# Altium PCB Audio-Switch-v2.0.PcbDoc (part 2 of 3)
Units mil, origin at the board's own origin, x right, y up, seen from the top; angles counter-clockwise.
Board outline 3937.01 x 3149.61 mil, 4 copper layers (Top Layer, Ground Layer, Power Layer, Bottom Layer), stack 60.4 mil thick; 165 components, 115 nets, 627 pads, 263 vias.
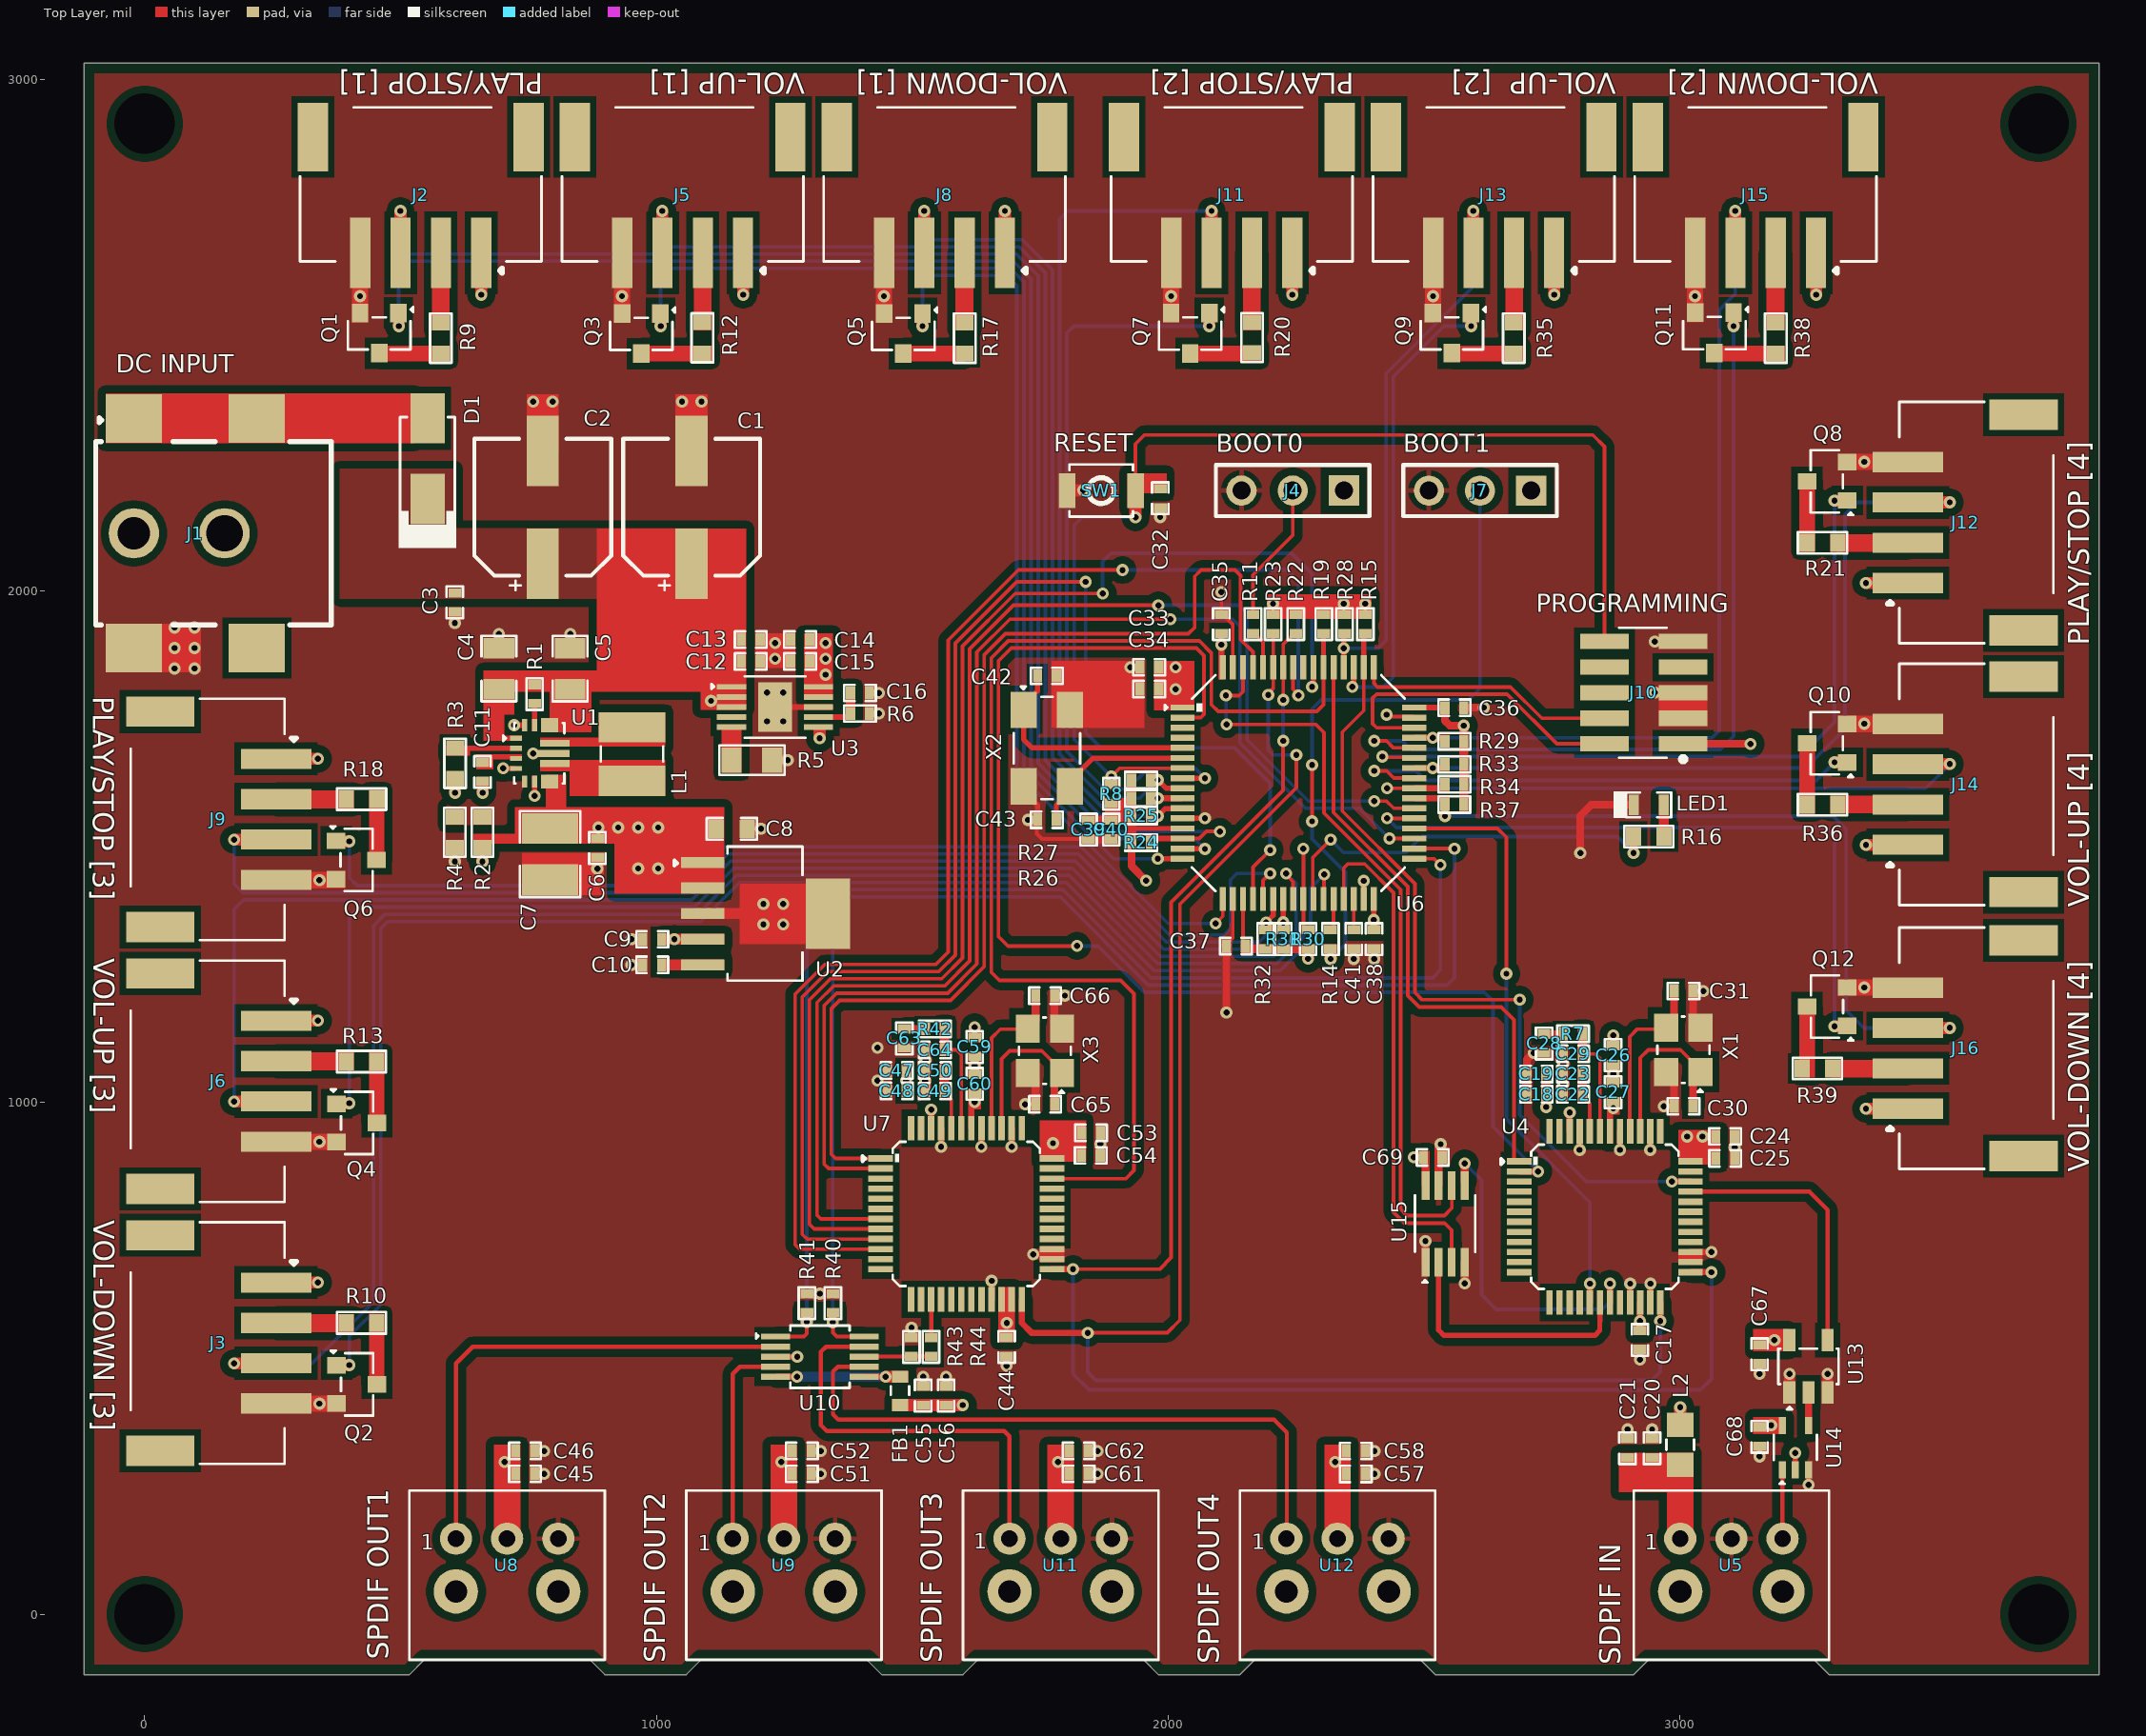
[diagram p0: Top Layer view]

## Part data (continued)
R1 R8 R11 R14 R15 R19 R24 R25 R26 R27 R28 R29 R30 R31 R32 R33 R34 R37 R40 R41 R43: library part RC0402FR-0710KL, "RES 10K OHM 1% 1/16W 0402", Case Code (Imperial)=0402, Case Code (Metric)=1005, LCSC Part Number=C60490, Manufacturer=Yageo, Max Operating Temperature=155°C, Max Power Dissipation=63mW, Min Operating Temperature=-55°C, Power Rating=62.5mW, Resistance=10kR, Resistance Tolerance=1%, Resistor Type="Thick Film", Supplier Part Number 1=603-RC0402FR-0710KL, Temperature Coefficient=100ppm/°C, Voltage Rating=50V, Case/Package=0402, Category="Chip SMD Resistors", ComponentLink1Description=https://datasheet.ciiva.com/7660/38568-7660787.pdf?src-supplier=Element14, ComponentLink1URL=https://datasheet.ciiva.com/7660/38568-7660787.pdf?src-supplier=Element14, ComponentLink2Description=https://datasheet.ciiva.com/7849/1686128-7849814.pdf?src-supplier=Element14, ComponentLink2URL=https://datasheet.ciiva.com/7849/1686128-7849814.pdf?src-supplier=Element14, ComponentLink3Description=https://datasheet.ciiva.com/7983/1018594-7983486.pdf?src-supplier=Element14, ComponentLink3URL=https://datasheet.ciiva.com/7983/1018594-7983486.pdf?src-supplier=Element14, ComponentLink4Description=https://datasheet.ciiva.com/22747/1018594-22747512.pdf?src-supplier=Element14, ComponentLink4URL=https://datasheet.ciiva.com/22747/1018594-22747512.pdf?src-supplier=Element14, ComponentLink5Description=https://datasheet.ciiva.com/12667/pyu-rc0402-51-rohs-l-6-r-12667067.pdf?src-supplier=Mouser, ComponentLink5URL=https://datasheet.ciiva.com/12667/pyu-rc0402-51-rohs-l-6-r-12667067.pdf?src-supplier=Mouser, ComponentLink6Description=https://datasheet.ciiva.com/7849/1784430-7849813.pdf?src-supplier=Element14, ComponentLink6URL=https://datasheet.ciiva.com/7849/1784430-7849813.pdf?src-supplier=Element14, ComponentLink7Description=https://datasheet.ciiva.com/7849/1784430-7849815.pdf?src-supplier=Element14, ComponentLink7URL=https://datasheet.ciiva.com/7849/1784430-7849815.pdf?src-supplier=Element14, Construction=Rectangular, Depth=0.5mm, Features="Moisture Resistant", Height=0.32mm, Item Type=Resistor, Lead Free="Lead Free", Lead Pitch=0.2mm, Length=1mm, Manufacturer Part Number=RC0402FR-0710KL, Military Standard=Not, Number of Pins=2, Number of Terminations=2, Packaging="Tape and Reel", Pricing 1="1=0.10000, 10=0.01400, 50=0.01400, 100=0.00500, 1000=0.00300, 10000=0.00200 (USD)", REACH SVHC="No SVHC", RoHS=Yes, RoHS Compliant=Yes, Series=RC, Stock 1=18648329, Supplier 1=Mouser, Termination=SMD/SMT, Tolerance=1%, Voltage Rating (DC)=50V, Width=0.5mm, Working Voltage=50V
R2: library part RT0603BRD07523KL, "RES SMD 523K OHM 0.1% 1/10W 0603", Case Code (Imperial)=0603, Case Code (Metric)=1608, LCSC Part Number=C861460, Manufacturer=Yageo, Max Operating Temperature=155°C, Max Power Dissipation=100mW, Min Operating Temperature=-55°C, Supplier Part Number=13-RT0603BRD07523KLCT-ND, Temperature Coefficient=25ppm/°C, Tolerance=0.1%, Voltage Rating=75V, Case/Package=0603, ComponentLink1Description=https://datasheet.ciiva.com/12812/pyu-rt-1-to-0-05-rohs-l-4-12812552.pdf?src-supplier=Mouser, ComponentLink1URL=https://datasheet.ciiva.com/12812/pyu-rt-1-to-0-05-rohs-l-4-12812552.pdf?src-supplier=Mouser, Features="Moisture Resistant", Height=0.022inch, Item Type=Resistor, Length=0.063inch, Manufacturer Part Number=RT0603BRD07523KL, Number of Terminations=2, Packaging="Tape and Reel", Power Rating=100mW, Pricing="1=0.13, 10=0.102, 50=0.081, 100=0.0728, 500=0.0558, 1000=0.04943 (USD)", RoHS=Yes, RoHS Compliant=Yes, Series=RT, Supplier=Digikey, Termination=SMD/SMT, Weight=7.1E-05oz, Width=0.8mm
R3 R4: library part RT0603BRD07100KL, "RES SMD 100K OHM 0.1% 1/10W 0603", Case Code (Imperial)=0603, Case Code (Metric)=1608, LCSC Part Number=C122538, Manufacturer=Yageo, Max Operating Temperature=125°C, Max Power Dissipation=100mW, Min Operating Temperature=-55°C, Package Quantity=5000, Resistance=100kR, Supplier Part Number 1=YAG1235CT-ND, Temperature Coefficient=25ppm/°C, Tolerance=0.1%, Voltage Rating=75V, Case/Package=0603, ComponentLink1Description=http://documents.rs-components.com/techlib://itc_doclist_GB.htm?stockno=6174810&src-supplier=RSComponents, ComponentLink1URL=http://documents.rs-components.com/techlib://itc_doclist_GB.htm?stockno=6174810&src-supplier=RSComponents, Composition="Thin Film", Depth=0.8mm, Features="Moisture Resistant", Height=0.022inch, Item Type=Resistor, Lead Free="Lead Free", Length=1.6mm, Manufacturer Part Number=RT0603BRD07100KL, Military Standard=Not, Mount="Surface Mount", Number of Terminations=2, Packaging="Tape and Reel", Power Rating=100mW, Pricing 1="1=0.39, 10=0.332, 100=0.1298, 1000=0.05435, 2500=0.04982 (USD)", Stock 1=53395, Supplier 1=Digi-Key, Termination=SMD/SMT, Voltage Rating (DC)=75V, Width=0.031inch, Working Voltage=75V
R5: library part RT0805BRD07649RL, "RES SMD 649 OHM 0.1% 1/8W 0805", Case Code (Imperial)=0805, Case Code (Metric)=2012, LCSC Part Number=C865602, Manufacturer=Yageo, Max Operating Temperature=125°C, Max Power Dissipation=125mW, Min Operating Temperature=-55°C, Package Quantity=5000, Resistor Type="Thin Film", Supplier Part Number 1=YAG4930CT-ND, Temperature Coefficient=25ppm/°C, Tolerance=0.1%, Voltage Rating=150V, Case/Package=0805, Category="Chip SMD Resistors", ComponentLink1Description=https://datasheet.ciiva.com/2585/pyu-rt-1-to-0-05-rohs-l-5-2585132.pdf?src-supplier=Digi-Key, ComponentLink1URL=https://datasheet.ciiva.com/2585/pyu-rt-1-to-0-05-rohs-l-5-2585132.pdf?src-supplier=Digi-Key, ComponentLink2Description=https://datasheet.ciiva.com/12704/pyu-rt-1-to-0-05-rohs-l-4-12704493.pdf?src-supplier=Mouser, ComponentLink2URL=https://datasheet.ciiva.com/12704/pyu-rt-1-to-0-05-rohs-l-4-12704493.pdf?src-supplier=Mouser, Contact Plating=Tin,Matte, Height=0.024inch, Item Type=Resistor, Lead Free="Lead Free", Length=0.079inch, Manufacturer Part Number=RT0805BRD07649RL, Number of Terminations=2, Packaging="Tape and Reel", Power Rating=125mW, Pricing 1="1=0.38000, 10=0.27200, 100=0.10870, 500=0.07404, 1000=0.05357, 2500=0.04963 (USD)", Radiation Hardening=No, Resistance=649R, RoHS=Yes, RoHS Compliant=Yes, Series=RT, Stock 1=6872, Supplier 1=Digi-Key, Termination=SMD/SMT, Voltage Rating (DC)=150V, Width=0.049inch
R6: library part RC0402FR-0749K9L, "RES 49.9K OHM 1% 1/16W 0402", Case Code (Imperial)=0402, Case Code (Metric)=1005, LCSC Part Number=C137969, Manufacturer=Yageo, Max Operating Temperature=155°C, Max Power Dissipation=63mW, Min Operating Temperature=-55°C, Power Rating=62.5mW, Supplier Part Number=311-49.9KLRCT-ND, Temperature Coefficient=100ppm/°C, Tolerance=1%, Voltage Rating=50V, Case/Package=0402, Category="Chip SMD Resistors", ComponentLink1Description=https://datasheet.ciiva.com/17071/pyu-rc0402-51-rohs-l-6-r-17071066.pdf?src-supplier=Future+Electronics, ComponentLink1URL=https://datasheet.ciiva.com/17071/pyu-rc0402-51-rohs-l-6-r-17071066.pdf?src-supplier=Future+Electronics, Construction=Rectangular, Depth=0.5mm, Features="Moisture Resistant", Item Type=Resistor, Lead Free="Lead Free", Length=1mm, Manufacturer Part Number=RC0402FR-0749K9L, Military Standard=Not, Number of Terminations=2, Packaging="Tape and Reel", Pricing="1=0.1, 10=0.015, 50=0.0088, 100=0.0073, 500=0.00488, 1000=0.00417, 5000=0.00297 (USD)", RoHS=Yes, RoHS Compliant=Yes, Series=RC, Stock=5084418, Supplier=Digikey, Termination=SMD/SMT, Voltage Rating (DC)=50V
R7 R42: library part RC0402FR-07680RL, "RES 680 OHM 1% 1/16W 0402", Case Code (Imperial)=0402, Case Code (Metric)=1005, Manufacturer=Yageo, Max Operating Temperature=155°C, Max Power Dissipation=63mW, Min Operating Temperature=-55°C, Resistance Tolerance=1%, Resistor Type="Thick Film", Supplier Part Number 1=7948052, Temperature Coefficient=100ppm/°C, Voltage Rating=50V, Case/Package=0402, Category="Chip SMD Resistors", ComponentLink1Description=https://datasheet.ciiva.com/12667/pyu-rc0402-51-rohs-l-6-r-12667916.pdf?src-supplier=Mouser, ComponentLink1URL=https://datasheet.ciiva.com/12667/pyu-rc0402-51-rohs-l-6-r-12667916.pdf?src-supplier=Mouser, ComponentLink2Description=https://datasheet.ciiva.com/7850/1018594-7850071.pdf?src-supplier=Element14, ComponentLink2URL=https://datasheet.ciiva.com/7850/1018594-7850071.pdf?src-supplier=Element14, ComponentLink3Description=https://datasheet.ciiva.com/7850/1018594-7850070.pdf?src-supplier=Element14, ComponentLink3URL=https://datasheet.ciiva.com/7850/1018594-7850070.pdf?src-supplier=Element14, ComponentLink4Description=https://datasheet.ciiva.com/17042/pyu-rc0402-51-rohs-l-6-r-17042399.pdf?src-supplier=Future+Electronics, ComponentLink4URL=https://datasheet.ciiva.com/17042/pyu-rc0402-51-rohs-l-6-r-17042399.pdf?src-supplier=Future+Electronics, Construction=Rectangular, Depth=0.5mm, Features="Moisture Resistant", Item Type=Resistor, Lead Free="Lead Free", Length=1mm, Manufacturer Part Number=RC0402FR-07680RL, Military Standard=Not, Number of Terminations=2, Packaging="Tape and Reel", Power Rating=63mW, Pricing 1="10000=0.0011, 100000=0.0011, 300000=0.001, 750000=0.001, 2000000=0.0009 (USD)", Reach SVHC Compliant=No, Resistance=680R, RoHS=Yes, RoHS Compliant=Yes, Series=RC, Size Code=0402, Stock 1=5080000, Supplier 1="Future Electronics", Termination=SMD/SMT, Tolerance=1%, Voltage Rating (AC)=50V
R9 R10 R12 R13 R17 R18 R20 R21 R35 R36 R38 R39: library part RC0603FR-07100RL, "RES SMD 100 OHM 1% 1/10W 0603", Case Code (Imperial)=0603, Case Code (Metric)=1608, LCSC Part Number=C105588, Manufacturer=Yageo, Max Operating Temperature=155°C, Max Power Dissipation=100mW, Min Operating Temperature=-55°C, Resistance Tolerance=1%, Resistor Type="Thick Film", Temperature Coefficient=100ppm/°C, Voltage Rating=50V, Case/Package=0603, Category="Chip SMD Resistors", Construction=Rectangular, Depth=0.8mm, Features="Moisture Resistant", Height=0.45mm, Item Type=Resistor, Lead Free="Lead Free", Length=1.6mm, Manufacturer Part Number=RC0603FR-07100RL, Military Standard=Not, Number of Pins=2, Number of Terminations=2, Packaging="Tape and Reel", Power Rating=100mW, Pricing 1="5000=0.00300, 5000=0.00200, 5000=0.00450, 50000=0.00410, 500000=0.00230, 2500000=0.00140 (USD)", REACH SVHC=Unknown, Resistance=100R, RoHS=Yes, RoHS Compliant=Yes, Series=RC, Size Code=0603, Stock 1=3800000, Supplier 1="Arrow Electronics", Supplier Part Number 1=RC0603FR-07100RL, Technology="THICK FILM", Termination=SMD/SMT, Tolerance=1%, Voltage Rating (DC)=50V, Width=0.8mm
R16: library part RC0603FR-07220RL, "RES SMD 220 OHM 1% 1/10W 0603", Case Code (Imperial)=0603, Case Code (Metric)=1608, LCSC Part Number=C107696, Manufacturer=Yageo, Max Operating Temperature=155°C, Max Power Dissipation=100mW, Min Operating Temperature=-55°C, Package Quantity=1, Supplier Part Number 1=311-220HRCT-ND, Temperature Coefficient=100ppm/°C, Tolerance=1%, Voltage Rating=50V, Case/Package=0603, ComponentLink1Description=http://www.yageo.com/documents/recent/PYu-RC_Group_51_RoHS_L_10.pdf?src-supplier=Digi-Key, ComponentLink1URL=http://www.yageo.com/documents/recent/PYu-RC_Group_51_RoHS_L_10.pdf?src-supplier=Digi-Key, ComponentLink2Description=http://www.farnell.com/datasheets/1868787.pdf?src-supplier=Element14, ComponentLink2URL=http://www.farnell.com/datasheets/1868787.pdf?src-supplier=Element14, Composition="Thick Film", Depth=0.8mm, Features="Moisture Resistant", Height=0.022inch, Item Type=Resistor, Lead Free="Lead Free", Length=1.6mm, Manufacturer Part Number=RC0603FR-07220RL, Military Standard=Not, Number of Pins=2, Number of Terminations=2, Packaging="Tape and Reel", Power Rating=100mW, Pricing 1="1=0.1, 10=0.023, 100=0.0094, 1000=0.00421, 2500=0.00366 (USD)", REACH SVHC="No SVHC", Resistance=220R, Stock 1=5843995, Supplier 1=Digi-Key, Termination=SMD/SMT, Voltage Rating (DC)=50V, Width=0.031inch
R22 R23: library part RC0402FR-074K7L, "RES 4.7K OHM 1% 1/16W 0402", Case Code (Imperial)=0402, Case Code (Metric)=1005, LCSC Part Number=C105871, Manufacturer=Yageo, Max Operating Temperature=155°C, Max Power Dissipation=63mW, Min Operating Temperature=-55°C, Power Rating=62.5mW, Resistance=4.7kR, Resistance Tolerance=1%, Resistor Type="Thick Film", Temperature Coefficient=100ppm/°C, Voltage Rating=50V, Case/Package=0402, Category="Chip SMD Resistors", ComponentLink1Description=https://datasheet.ciiva.com/22661/1686128-22661342.pdf?src-supplier=Element14, ComponentLink1URL=https://datasheet.ciiva.com/22661/1686128-22661342.pdf?src-supplier=Element14, ComponentLink2Description=https://datasheet.ciiva.com/7850/1018594-7850022.pdf?src-supplier=Element14, ComponentLink2URL=https://datasheet.ciiva.com/7850/1018594-7850022.pdf?src-supplier=Element14, ComponentLink3Description=https://datasheet.ciiva.com/7850/1018594-7850023.pdf?src-supplier=Element14, ComponentLink3URL=https://datasheet.ciiva.com/7850/1018594-7850023.pdf?src-supplier=Element14, ComponentLink4Description=https://datasheet.ciiva.com/15215/getdatasheetpartid-328119-15215035.pdf?src-supplier=Verical, ComponentLink4URL=https://datasheet.ciiva.com/15215/getdatasheetpartid-328119-15215035.pdf?src-supplier=Verical, Construction=Rectangular, Depth=0.5mm, Features="Moisture Resistant", Height=0.32mm, Height - Seated (Max)=0.016inch, Item Type=Resistor, Lead Free="Lead Free", Length=1mm, Manufacturer Part Number=RC0402FR-074K7L, Military Standard=Not, Number of Pins=2, Number of Terminations=2, Packaging="Tape and Reel", Pricing 1="10000=0.00085 (USD)", Reach SVHC Compliant=Yes, RoHS=Yes, RoHS Compliant=Yes, Series=RC, Size Code=0402, Stock 1=2420000, Supplier 1=Avnet, Supplier Part Number 1=RC0402FR-074K7L, Termination=SMD/SMT, Tolerance=1%, Voltage Rating (DC)=50V, Width=0.5mm
R44: library part RC0402FR-0733RL, "RES 33 OHM 1% 1/16W 0402", Case Code (Imperial)=0402, Case Code (Metric)=1005, LCSC Part Number=C138002, Manufacturer=Yageo, Max Operating Temperature=155°C, Max Power Dissipation=63mW, Min Operating Temperature=-55°C, Package Quantity=10000, Power Rating=62.5mW, Resistance Tolerance=1%, Resistor Type="Thick Film", Supplier Part Number 1=603-RC0402FR-0733RL, Temperature Coefficient=100ppm/°C, Voltage Rating=50V, Case/Package=0402, Category="Chip SMD Resistors", ComponentLink1Description=https://datasheet.ciiva.com/11819/0900766b80c66297-11819487.pdf?src-supplier=RSComponents, ComponentLink1URL=https://datasheet.ciiva.com/11819/0900766b80c66297-11819487.pdf?src-supplier=RSComponents, ComponentLink2Description=https://datasheet.ciiva.com/24070/pyu-rc0402-51-rohs-l-6-r-8721-24070077.pdf?src-supplier=Mouser, ComponentLink2URL=https://datasheet.ciiva.com/24070/pyu-rc0402-51-rohs-l-6-r-8721-24070077.pdf?src-supplier=Mouser, ComponentLink3Description=https://datasheet.ciiva.com/7849/1018594-7849967.pdf?src-supplier=Element14, ComponentLink3URL=https://datasheet.ciiva.com/7849/1018594-7849967.pdf?src-supplier=Element14, ComponentLink4Description=https://datasheet.ciiva.com/7849/1018594-7849966.pdf?src-supplier=Element14, ComponentLink4URL=https://datasheet.ciiva.com/7849/1018594-7849966.pdf?src-supplier=Element14, ComponentLink5Description=https://datasheet.ciiva.com/15189/getdatasheetpartid-329253-15189431.pdf?src-supplier=Verical, ComponentLink5URL=https://datasheet.ciiva.com/15189/getdatasheetpartid-329253-15189431.pdf?src-supplier=Verical, ComponentLink6Description=https://datasheet.ciiva.com/17070/pyu-rc0402-51-rohs-l-6-r-17070335.pdf?src-supplier=Future+Electronics, ComponentLink6URL=https://datasheet.ciiva.com/17070/pyu-rc0402-51-rohs-l-6-r-17070335.pdf?src-supplier=Future+Electronics, Construction=Rectangular, Depth=0.5mm, Features="Moisture Resistant", Height=0.35mm, Lead Free="Lead Free", Length=1mm, Manufacturer Part Number=RC0402FR-0733RL, Military Standard=Not, Number of Pins=2, Number of Terminations=2, Packaging="Tape and Reel", Pricing 1="1=0.10000, 10=0.01200, 50=0.01200, 100=0.00500, 1000=0.00300, 10000=0.00100 (USD)", REACH SVHC=Unknown, Resistance=33R, RoHS=Yes, RoHS Compliant=Yes, Series=RC, Size Code=0402, Stock 1=1843488, Supplier 1=Mouser, Technology="THICK FILM", Termination=SMD/SMT, Tolerance=1%, Voltage Rating (DC)=50V, Width=0.5mm
SW1: "SWITCH TACTILE SPST-NO 0.05A 12V", Contact Current Rating=50mA, Contact Resistance=100mR, Insulation Resistance=100MR, LCSC Part Number=C231329, Manufacturer=Omron, Max Operating Temperature=70°C, Max Voltage Rating (DC)=12V, Min Operating Temperature=-25°C, Operating Force=1.5N, Package Quantity=1, Ratings="Dust Proof,IP40", Supplier Part Number 1=SW1020DKR-ND, Actuator Length=0.4mm, Actuator Type=Standard, ComponentLink1Description=http://www.farnell.com/datasheets/60838.pdf?src-supplier=Farnell, ComponentLink1URL=http://www.farnell.com/datasheets/60838.pdf?src-supplier=Farnell, ComponentLink2Description=http://www.farnell.com/datasheets/60838.pdf?src-supplier=Element14, ComponentLink2URL=http://www.farnell.com/datasheets/60838.pdf?src-supplier=Element14, ComponentLink3Description=https://omronfs.omron.com/en_US/ecb/products/pdf/en-b3u.pdf?src-supplier=Digi-Key, ComponentLink3URL=https://omronfs.omron.com/en_US/ecb/products/pdf/en-b3u.pdf?src-supplier=Digi-Key, ComponentLink4Description=http://www.omron.com/ecb/products/pdf/en-b3u.pdf?src-supplier=Digi-Key, ComponentLink4URL=http://www.omron.com/ecb/products/pdf/en-b3u.pdf?src-supplier=Digi-Key, ComponentLink5Description=https://www.distrelec.biz/Web/Downloads/he/et/B3U_eng_datasheet.pdf?mime=application%2Fpdf&src-supplier=Distrelec, ComponentLink5URL=https://www.distrelec.biz/Web/Downloads/he/et/B3U_eng_datasheet.pdf?mime=application%2Fpdf&src-supplier=Distrelec, ComponentLink6Description=http://www.onlinecomponents.com/productFiles/mf-OM/en-b3u.pdf?src-supplier=Onlinecomponents.com, ComponentLink6URL=http://www.onlinecomponents.com/productFiles/mf-OM/en-b3u.pdf?src-supplier=Onlinecomponents.com, ComponentLink7Description=https://www.verical.com/server-webapp/html/getDatasheet?partID=552554&src-supplier=Verical, ComponentLink7URL=https://www.verical.com/server-webapp/html/getDatasheet?partID=552554&src-supplier=Verical, ComponentLink8Description=http://www.farnell.com/datasheets/1685550.pdf?src-supplier=Element14, ComponentLink8URL=http://www.farnell.com/datasheets/1685550.pdf?src-supplier=Element14, ComponentLink9Description=http://www.farnell.com/datasheets/2610940.pdf?src-supplier=Farnell, ComponentLink9URL=http://www.farnell.com/datasheets/2610940.pdf?src-supplier=Farnell, ComponentLink10Description=https://www.alliedelec.com/m/d/4c8a9ef82804fc3c241a13c1e298fd73.pdf?src-supplier=Allied+Electronics, ComponentLink10URL=https://www.alliedelec.com/m/d/4c8a9ef82804fc3c241a13c1e298fd73.pdf?src-supplier=Allied+Electronics, Contact Material=Silver, Current Rating=50mA, Depth=2.5mm, Electrical Life=200000Cycles, Height=1.2mm, Illumination Type=Non-Illuminated,Illuminated, Item Type=Switch, Lead Free="Lead Free", Length=4mm, Manufacturer Part Number=B3U-1000P, Max Current Rating=50mA, Mechanical Life=200000Cycles, Mount="Surface Mount", Orientation=Straight, Packaging="Tape and Reel", Pricing 1="1=1, 10=0.961, 25=0.9064, 50=0.7976, 100=0.7251, 250=0.68888, 500=0.67074, 1000=0.52571 (USD)", REACH SVHC=Unknown, Stock 1=116454, Supplier 1=Digi-Key, Switch Function=Off-Mom, Switch Travel=0.15mm, Termination=SMD/SMT, Throw Configuration=SPST, Voltage Rating (DC)=12V, Weight=0.000776oz, Width=3mm
U1: "IC REG BCK BST ADJ 3.6A 15VQFN", LCSC Part Number=C109322, Manufacturer="Texas Instruments", Supplier Part Number=595-TPS63070RNMR, Category="Voltage Regulators - Switching", ComponentLink1Description=http://www.ti.com/lit/ds/symlink/tps63070.pdf?src-supplier=Digi-Key, ComponentLink1URL=http://www.ti.com/lit/ds/symlink/tps63070.pdf?src-supplier=Digi-Key, ComponentLink2Description=http://www.ti.com/lit/ds/symlink/tps63070.pdf?src-supplier=Farnell, ComponentLink2URL=http://www.ti.com/lit/ds/symlink/tps63070.pdf?src-supplier=Farnell, Item Type=IC, Manufacturer Part Number=TPS63070RNMR, Pricing="1=2.7, 10=2.29, 50=2.29, 100=1.99, 1000=1.43, 10000=1.21 (USD)", RoHS=Yes, Stock=55982, Supplier=Mouser
U2: "IC REG LINEAR 3.3V 1A SOT223-6", LCSC Part Number=C485803, Manufacturer="Texas Instruments", Supplier Part Number=595-TPS79633DCQR, Category="Voltage Regulators - Linear", ComponentLink1Description=https://datasheet.ciiva.com/2045/tps79601-2045264.pdf?src-supplier=Digi-Key, ComponentLink1URL=https://datasheet.ciiva.com/2045/tps79601-2045264.pdf?src-supplier=Digi-Key, ComponentLink2Description=https://datasheet.ciiva.com/22704/1846966-22704703.pdf?src-supplier=Element14, ComponentLink2URL=https://datasheet.ciiva.com/22704/1846966-22704703.pdf?src-supplier=Element14, ComponentLink3Description=https://datasheet.ciiva.com/41462/001015136-da-01-en-ic-reg-ldo-3-3v-1-tps79633dcqr-sot-6-tid-41462982.pdf?src-supplier=Conrad, ComponentLink3URL=https://datasheet.ciiva.com/41462/001015136-da-01-en-ic-reg-ldo-3-3v-1-tps79633dcqr-sot-6-tid-41462982.pdf?src-supplier=Conrad, Item Type=IC, Length=6.5mm, Manufacturer Part Number=TPS79633DCQR, Pricing="1=3.24, 10=2.75, 50=2.75, 100=2.39, 1000=1.72, 10000=1.56 (USD)", RoHS=Yes, Stock=3089, Supplier=Mouser, Thickness=1.6mm, Width=3.5mm
U3: "IC REG LIN POS ADJ 200MA 10MSOP", Manufacturer="Analog Devices / Linear Technology", Supplier Part Number=584-LT3042IMSE#PBF, ComponentLink1Description=http://www.farnell.com/datasheets/1941078.pdf?src-supplier=Farnell, ComponentLink1URL=http://www.farnell.com/datasheets/1941078.pdf?src-supplier=Farnell, ComponentLink2Description=https://datasheet.octopart.com/LT3042IMSE%23PBF-Linear-Technology-datasheet-41232635.pdf?src-supplier=Farnell, ComponentLink2URL=https://datasheet.octopart.com/LT3042IMSE%23PBF-Linear-Technology-datasheet-41232635.pdf?src-supplier=Farnell, ComponentLink3Description=https://datasheet.octopart.com/LT3042IMSE%23PBF-Analog-Devices-datasheet-138896359.pdf?src-supplier=Element14, ComponentLink3URL=https://datasheet.octopart.com/LT3042IMSE%23PBF-Analog-Devices-datasheet-138896359.pdf?src-supplier=Element14, ComponentLink4Description=http://www.linear.com/docs/55649?src-supplier=Digikey, ComponentLink4URL=http://www.linear.com/docs/55649?src-supplier=Digikey, Item Type=IC, Manufacturer Part Number=LT3042IMSE#PBF, Pricing="1=6.55, 10=5.91, 50=5.75, 100=5.09, 1000=4.11, 10000=4.11 (USD)", RoHS=Yes, Stock=18453, Supplier=Mouser
U4 U7: "IC AUDIO TRANSCEIVER 48LQFP", Manufacturer="Texas Instruments", Supplier Part Number=595-PCM9211PTR, ComponentLink1Description=https://datasheet.ciiva.com/1825/pcm9211-1825949.pdf?src-supplier=Digikey, ComponentLink1URL=https://datasheet.ciiva.com/1825/pcm9211-1825949.pdf?src-supplier=Digikey, ComponentLink2Description=https://datasheet.ciiva.com/3026/sbas495-3026720.pdf?src-supplier=Avnet, ComponentLink2URL=https://datasheet.ciiva.com/3026/sbas495-3026720.pdf?src-supplier=Avnet, ComponentLink3Description=https://datasheet.ciiva.com/1825/pcm9211-1825950.pdf?src-supplier=Digikey, ComponentLink3URL=https://datasheet.ciiva.com/1825/pcm9211-1825950.pdf?src-supplier=Digikey, ComponentLink4Description=https://datasheet.ciiva.com/1825/pcm9211-1825951.pdf?src-supplier=Digikey, ComponentLink4URL=https://datasheet.ciiva.com/1825/pcm9211-1825951.pdf?src-supplier=Digikey, Item Type="Amplifiers - Audio", Manufacturer Part Number=PCM9211PTR, Pricing="1=3.06, 10=2.74, 50=2.74, 100=2.51, 1000=1.8, 10000=1.49 (USD)", RoHS=Yes, Stock=2280, Supplier=Mouser
U5: "FIBER OPTIC RECEIVER IR", LCSC Part Number=C17427482, Manufacturer=Everlight, Supplier Part Number=1080-PLR237/T10BK-ND, Item Type="FIBER OPTIC RECEIVER", Manufacturer Part Number=PLR237/T10BK, Pricing="1=3.86, 60=2.727, 120=2.2335, 540=1.88291, 1020=1.72708, 2040=1.65566, 5040=1.6232 (USD)", RoHS=No, Stock=4654, Supplier=Digikey
U6: "IC MCU 32BIT 256KB FLASH 64LQFP", Case/Package=LQFP, Clock Frequency=84MHz, Manufacturer=STMicroelectronics, Max Operating Temperature=85°C, Max Power Dissipation=313mW, Max Supply Voltage=3.6V, Min Operating Temperature=-40°C, Min Supply Voltage=1.8V, Nominal Supply Current=1.8uA, Operating Supply Voltage=3.3V, Package Quantity=960, Supplier Part Number=511-STM32F401RCT6, ComponentLink1Description=https://datasheet.ciiva.com/29721/dm00086815-29721898.pdf?src-supplier=Digikey, ComponentLink1URL=https://datasheet.ciiva.com/29721/dm00086815-29721898.pdf?src-supplier=Digikey, ComponentLink2Description=https://datasheet.ciiva.com/24182/dm00086815-24182823.pdf?src-supplier=Future+Electronics, ComponentLink2URL=https://datasheet.ciiva.com/24182/dm00086815-24182823.pdf?src-supplier=Future+Electronics, Core Architecture=ARM, Data Bus Width=32b, Frequency=84MHz, Height=1.45mm, Interface=I2C,SPI,USB,IrDA,SDIO,UART,USART,I2S, Item Type=Microcontrollers, Lead Free="Lead Free", Length=10mm, Manufacturer Part Number=STM32F401RCT6, Memory Format=FLASH, Memory Size=256KB, Number of A/D Converters=1NUMBER, Number of Channels=16NUMBER, Number of I2C Channels=3, Number of I/Os=50, Number of Programmable I/O=50, Number of PWM Channels=4, Number of SPI Channels=7, Number of Timers/Counters=8, Number of USB Channels=1, Oscillator Type=Internal, Packaging=Tray, Peripherals="Brown-out Detect/Reset,POR,PWM,WDT,DMA", Pins=64, Pricing="1=5.1, 10=4.73, 25=4.34, 50=4.34, 100=4.08, 250=3.74, 500=3.73, 960=3.36, 1000=3.36, 10000=3.36 (USD)", Radiation Hardening=No, RAM Size=64KB, Reach SVHC Compliant=No, RoHS=Yes, RoHS Compliant=Yes, Series=STM32F4, Stock=3502, Supplier=Mouser, Watchdog Timer=Yes, Weight=0.012088oz, Width=10mm
U8 U9 U11 U12: "TRANSMITTER FBR OPT IR PHOTOLINK", LCSC Part Number=C2940206, Manufacturer=Everlight, Max Operating Temperature=70°C, Min Operating Temperature=-20°C, Operating Supply Voltage=5V, Package Quantity=500, Supplier Part Number=1080-1430-ND, Supply Current=3mA, ComponentLink1Description=http://components.arrow.com/part/dataview/47954421S9333883N2104?src-supplier=Arrow+Electronics, ComponentLink1URL=http://components.arrow.com/part/dataview/47954421S9333883N2104?src-supplier=Arrow+Electronics, ComponentLink2Description=http://www.everlight.com/file/ProductFile/PLT133-T10W.pdf?src-supplier=Digikey, ComponentLink2URL=http://www.everlight.com/file/ProductFile/PLT133-T10W.pdf?src-supplier=Digikey, ComponentLink3Description=http://www.everlight.com/index.php?option=com_k2&view=item&id=271:transmitter-plt-module&Itemid=264&lang=en&src-supplier=Mouser, ComponentLink3URL=http://www.everlight.com/index.php?option=com_k2&view=item&id=271:transmitter-plt-module&Itemid=264&lang=en&src-supplier=Mouser, ComponentLink4Description=http://www.everlight.com/datasheets/PLT133_T9_datasheet.pdf?src-supplier=Future+Electronics, ComponentLink4URL=http://www.everlight.com/datasheets/PLT133_T9_datasheet.pdf?src-supplier=Future+Electronics, Data Rate=16Mbps, Item Type=IC, Lead Free="Lead Free", Manufacturer Part Number=PLT133/T10W, Pricing="1=3.09, 60=2.0575, 120=1.58333, 540=1.4313, 1020=1.23002, 2040=1.16293, 5040=1.13609 (USD)", RoHS=Yes, RoHS Compliant=Yes, Series=-, Stock=13385, Supplier=Digikey, Wavelength=660nm
U10: "IC SWITCH SP4T X 1 5OHM 10VSSOP", LCSC Part Number=C2840022, Manufacturer="Texas Instruments", Supplier Part Number=595-TMUX1204DGSR, ComponentLink1Description=http://www.ti.com/general/docs/suppproductinfo.tsp?distId=10&amp;gotoUrl=http%3A%2F%2Fwww.ti.com%2Flit%2Fgpn%2Ftmux1204&src-supplier=Digikey, ComponentLink1URL=http://www.ti.com/general/docs/suppproductinfo.tsp?distId=10&amp;gotoUrl=http%3A%2F%2Fwww.ti.com%2Flit%2Fgpn%2Ftmux1204&src-supplier=Digikey, Item Type=IC, Manufacturer Part Number=TMUX1204DGSR, Pricing="1=0.94, 10=0.776, 50=0.776, 100=0.589, 1000=0.401, 10000=0.325 (USD)", RoHS=Yes, Stock=10828, Supplier=Mouser
U13: "IC BUFF NON-INVERT 5.5V SOT23-5", Case/Package=SOT-23-5, High Level Output Current=32mA, Manufacturer="Texas Instruments", Max Operating Temperature=125°C, Max Supply Current=10uA, Max Supply Voltage=5.5V, Min Operating Temperature=-40°C, Min Supply Voltage=1.65V, Package Quantity=3000, Supplier Part Number 1=595-SN74LVC1G125DBVR, Height=1.15mm, Item Type="Buffers, Drivers and Transceivers", Lead Free="Lead Free", Length=2.9mm, Logic Function=Buffer,Inverting, Low Level Output Current=32mA, Manufacturer Part Number=SN74LVC1G125DBVR, Mount="Surface Mount", Number of Bits=1, Number of Bits per Element=1, Number of Channels=1, Number of Circuits=1, Number of Elements=1, Number of Gates=1, Number of Input Lines=1, Number of Output Lines=1, Output Type=3-STATE, Packaging="Tape and Reel", Polarity=Non-Inverting, Pricing 1="1=0.36, 10=0.243, 50=0.243, 100=0.102, 1000=0.07, 10000=0.037 (USD)", Propagation Delay=4ns, Quiescent Current=10uA, RoHS=Yes, RoHS Compliant=Yes, Series=74LVC, Stock 1=237997, Supplier 1=Mouser, Technology=CMOS, Weight=0.001446oz, Width=1.6mm
U14: "IC GATE AND 1CH 2-INP SC70-5", Case/Package=SC, High Level Output Current=-32mA, LCSC Part Number=C7832, Low Level Output Current=32mA, Manufacturer="Texas Instruments", Max Operating Temperature=125°C, Max Supply Voltage=5.5V, Min Operating Temperature=-40°C, Min Supply Voltage=1.65V, Quiescent Current=10uA, Supplier Part Number 1=595-SN74LVC1G08DCKR, ComponentLink1Description=https://datasheet.ciiva.com/14290/sn74lvc1g08-14290720.pdf?src-supplier=Avnet, ComponentLink1URL=https://datasheet.ciiva.com/14290/sn74lvc1g08-14290720.pdf?src-supplier=Avnet, ComponentLink2Description=https://datasheet.ciiva.com/28540/1772545-28540798.pdf?src-supplier=Element14, ComponentLink2URL=https://datasheet.ciiva.com/28540/1772545-28540798.pdf?src-supplier=Element14, ComponentLink3Description=https://datasheet.ciiva.com/1864/sn74lvc1g08-1864342.pdf?src-supplier=Digikey, ComponentLink3URL=https://datasheet.ciiva.com/1864/sn74lvc1g08-1864342.pdf?src-supplier=Digikey, ComponentLink4Description=https://datasheet.ciiva.com/1864/sn74lvc1g08-1864341.pdf?src-supplier=Digikey, ComponentLink4URL=https://datasheet.ciiva.com/1864/sn74lvc1g08-1864341.pdf?src-supplier=Digikey, ComponentLink5Description=https://datasheet.ciiva.com/1864/sn74lvc1g08-1864343.pdf?src-supplier=Digikey, ComponentLink5URL=https://datasheet.ciiva.com/1864/sn74lvc1g08-1864343.pdf?src-supplier=Digikey, ComponentLink6Description=https://datasheet.ciiva.com/14290/sn74lvc1g08-14290717.pdf?src-supplier=Avnet, ComponentLink6URL=https://datasheet.ciiva.com/14290/sn74lvc1g08-14290717.pdf?src-supplier=Avnet, Height=1mm, Item Type="Logic Gates", Lead Free="Lead Free", Length=2.15mm, Logic Function="AND GATE", Manufacturer Part Number=SN74LVC1G08DCKR, Max Output Current=32mA, Mount="Surface Mount", Number of Bits=1, Number of Channels=1NUMBER, Number of Circuits=1, Number of Elements=1, Number of Gates=1, Number of Input Lines=2, Number of Inputs=2, Number of Output Lines=1, Number of Outputs=1, Number of Pins=5, Output Current=32mA, Packaging="Tape and Reel", Pricing 1="1=0.33, 10=0.228, 50=0.228, 100=0.095, 1000=0.065, 10000=0.035 (USD)", Propagation Delay=4ns, Radiation Hardening=No, Reach SVHC Compliant=No, RoHS=Yes, RoHS Compliant=Yes, Schmitt Trigger Input=No, Series=74LVC, Stock 1=509262, Supplier 1=Mouser, Technology=CMOS, Termination=SMD/SMT, Thickness=900um, Turn-On Delay Time=4.5ns, Weight=8.8E-05oz, Width=1.4mm
U15: "IC BUFFER NON-INVERT 5.5V SM8", LCSC Part Number=C206035, Manufacturer="Texas Instruments", Nominal Supply Current=10uA, Supplier Part Number 1=595-SN74LVC2G125DCTR, ComponentLink1Description=https://datasheet.ciiva.com/7744/1781747-7744021.pdf?src-supplier=Element14, ComponentLink1URL=https://datasheet.ciiva.com/7744/1781747-7744021.pdf?src-supplier=Element14, ComponentLink2Description=https://datasheet.ciiva.com/7744/1781747-7744022.pdf?src-supplier=Element14, ComponentLink2URL=https://datasheet.ciiva.com/7744/1781747-7744022.pdf?src-supplier=Element14, Item Type=IC, Manufacturer Part Number=SN74LVC2G125DCTR, Number of Circuits=1NUMBER, Pricing 1="1=0.52, 10=0.427, 50=0.427, 100=0.316, 1000=0.241, 10000=0.19 (USD)", RoHS=Yes, Stock 1=14743, Supplier 1=Mouser, Thickness=1.29mm
X1 X3: "24.576MHz SMD Crystal Resonator 12pF 60Ω ±10ppm -40℃~+85℃ SMD3225-4P Crystals ROHS", LCSC Part Number=C390772, Manufacturer=JGHC, ComponentLink1Description=LCSC, ComponentLink1URL=https://lcsc.com/product-detail/Crystals_JGHC-S3224576121060_C390772.html, Manufacturer Part Number=S3224576121060
X2: library part 5TJ480000XYLBC, "8MHz 18pF ±10ppm SMD5032-4P Crystals ROHS", LCSC Part Number=C2149247, Manufacturer=JYJE, Package=SMD5032-4P, ComponentLink1Description=LCSC, ComponentLink1URL=https://www.lcsc.com/product-detail/Crystals_JYJE-5TJ480000XYLBC_C2149247.html, Item Type=Crystal, Manufacturer Part Number=5TJ480000XYLBC

## Free pads (board coordinates)
  round 0 hole 118.11: MH1(0,0) MH1(0,2913.39) MH1(3700.79,0) MH1(3700.79,2913.39)

## Via types
v1: diameter 23.62, hole 11.81, Top Layer to Bottom Layer, 263 vias

## Nets (pads, with @x,y where several pads share a name; then routed paths per layer and width w, separated by ;. In a path a pad name is that pad's centre, name@x,y a point inside that pad or via, vN(x,y) a via of type N, cw(c..) or ccw(c..) an arc to the next point about the centre after c; other vN are vias at no path point)
3V3: C9.2 C17.2 C24.2 C25.2 C26.2 C27.2 C33.2 C34.2 C35.2 C36.2 C37.2 C38.2 C39.2 C40.2 C44.2 C53.2 C54.2 C59.2 C60.2 C67.2 C68.2 C69.2 J2.1 J3.1 J4.1 J5.1 J6.1 J7.1 J8.1 J9.1 J10.1 J11.1 J12.1 J13.1 J14.1 J15.1 J16.1 R8.2 R15.1 R19.1 R22.1 R23.1 R24.2 R25.2 R26.2 R27.2 R28.2 R29.2 R30.2 R31.2 R32.2 R33.2 R34.2 R37.2 U2.4 U4.22 U4.36 U4.42 U6.1 U6.13 U6.19 U6.32 U6.48 U6.64 U7.22 U7.23 U7.36 U7.42 U13.5 U14.2 U14.5 U15.8 | length 639
  Top Layer w7: U6.19@2146.22,1398.07 2146.22,1310.81 C37.2@2150.94,1306.09
  Top Layer w10: C40.2@1888.99,1548.18 C40.2@1896.49,1548.18 ; 1928.72,1529.96 1934.63,1535.86 U6.13@2028.11,1535.86 ; C38.2@2402.13,1338.31 U6.32@2402.13,1398.07 ; U14.2@3225.75,282.09 v1(3225.75,315.31)
  Top Layer w12: v1(2922.31,572.85) 2922.41,572.95 2922.41,609.33 U4.22@2922.5,609.43
  Top Layer w15: 1928.72,1529.96 R24.2@1928.72,1508.18 1928.72,1462 v1(1956.72,1434) ; C36.2@2540.99,1772.08 2541,1746.36 2550.65,1736.71 v1(2577.99,1736.71) ; J10.1@3006.26,1701.25 3006.39,1701.12 3137.88,1701.12 v1(3138,1701)
  other v1: 3178.48,369.24 3184.87,535.93 1684.59,569 338.66,648.44 2480.26,893 1774.93,920.55 3014.21,933.75 3044.32,933.75 3363.63,987.85 2869.74,989.25 1621.78,1001.35 2869.74,1131.49 1621.84,1147.44 338.66,1160.25 2273.33,1280.98 1035.01,1319.34 2402,1357 3363.63,1503.52 338.66,1672.06 2014.49,1808.2 2014.49,1850.82 2103.9,1894.96 2204.88,1975 2343.07,1975 2385,1975 3363.63,2015.33 657.93,2579.08 1169.74,2579.08 2242.93,2579.08 2754.74,2579.08 3266.55,2579.08 1680.89,2742.93
5V: C6.2 C7.1 C8.2 C18.2 C19.2 C47.2 C48.2 R2.2 R3.2 U1.7_8 U2.1 U2.2 U4.46 U7.46 | length 72.8
  Top Layer w12: U7.46@1536.8,949.81 v1@1536.8,986.2 ; U4.46@2784.7,944.07 v1@2784.7,980.46
  other v1: 2784.8,980.55 1536.89,986.29 2738.54,991.39 1487.91,1042.69 964.37,1457.64 1003.37,1457.64 660.01,1470.9 886.37,1537.64 925.37,1537.64 964.37,1537.64 1003.37,1537.64 606.49,1605.71
5V_FILT: C14.2 C15.2 C45.2 C46.2 C51.2 C52.2 C55.2 C56.2 C57.2 C58.2 C61.2 C62.2 FB1.1 L2.1 U3.9 U3.10 U8.2 U9.2 U11.2 U12.2
  other v1: 703.07,297.5 1244.01,297.49 1784.96,297.5 2326.33,297.25 3000.75,404.49 1598.73,408.67 1330.79,1836.5 1330.79,1867.34 1330.79,1898.17
A0: R41.2 U6.33 U10.1 | length 2512.4
  Top Layer w7: U10.1@1232.87,542.66 1288.1,542.66 1294,548.57 R41.2@1294,589.5 ; U6.33@2480.87,1476.81 2519.59,1476.81 2531.75,1464.65 v1(2532,1464.65)
  Bottom Layer w7: v1(1293.75,570.83) 1293.75,1390.43 1319.41,1416.09 1794.67,1416.09 1966.98,1243.78 2516.68,1243.78 2532,1259.1 v1(2532,1464.65)
A1: R40.2 U6.34 U10.10 | length 2543.4
  Top Layer w7: R40.2@1345,589.32 1345,549.99 1352.32,542.66 U10.10@1406.1,542.66 ; U6.34@2480.87,1496.49 v1(2559.48,1496.49)
  Bottom Layer w7: v1(1344.75,570.65) 1344.75,1377 1369.84,1402.09 1788.87,1402.09 1961.18,1229.78 2545.34,1229.78 2559.48,1243.92 v1(2559.48,1496.49)
BOOT_0: R11.2 U6.60 | length 76.3
  Top Layer w7: R11.2@2165.91,1916.95 2169.41,1916.95 2174.91,1911.45 2174.91,1911.02 2185.59,1900.34 U6.60@2185.59,1850.82
BOOT_1: R14.2 U6.28 | length 62.8
  Top Layer w7: R14.2@2317.48,1337.97 2317.89,1337.97 2323.39,1343.47 U6.28@2323.39,1398.07
DC_IN: C1.1 C2.1 C3.2 C4.2 C5.2 C12.2 C13.2 D1.1 R1.1 U1.1 U1.12_13 U3.1 U3.2 U3.3 U3.6
  other v1: 1319.01,1712.34 1106.76,1785.26
GND: C1.2 C2.2 C3.1 C4.1 C5.1 C6.1 C7.2 C8.1 C9.1 C10.1 C11.1 C12.1 C13.1 C14.1 C15.1 C16.1 C17.1 C18.1 C19.1 C20.1 C21.1 C22.1 C23.1 C24.1 C25.1 C26.1 C27.1 C28.2 C29.2 C30.1 C31.1 C32.1 C33.1 C34.1 C35.1 C36.1 C37.1 C38.1 C39.1 C40.1 C41.1 C42.1 C43.1 C44.1 C45.1 C46.1 C47.1 C48.1 C49.1 C50.1 C51.1 C52.1 C53.1 C54.1 C55.1 C56.1 C57.1 C58.1 C59.1 C60.1 C61.1 C62.1 C63.2 C64.2 C65.1 C66.1 C67.1 C68.1 C69.1 J1.2 J2.4 J3.4 J4.3 J5.4 J6.4 J7.3 J8.4 J9.4 J10.3 J10.5 J10.9 J11.4 J12.4 J13.4 J14.4 J15.4 J16.4 LED1.2 Q1.2 Q2.2 Q3.2 Q4.2 Q5.2 Q6.2 Q7.2 Q8.2 Q9.2 Q10.2 Q11.2 Q12.2 R4.1 R5.2 R6.1 R40.1 R41.1 R43.1 SW1.2 U1.4 U1.6 U1.10 U1.15 U2.3 U2.6 U3.8 U3.11 U4.21 U4.23 U4.26 U4.27 U4.38 U4.41 U4.45 U5.2 U6.12 U6.18 U6.31 U6.47 U6.63 U7.21 U7.26 U7.27 U7.38 U7.41 U7.45 U8.3 U9.3 U10.3 U11.3 U12.3 U13.1 U13.3 U14.3 U15.1 U15.4 U15.7 X1.2 X1.4 X2.2 X2.4 X3.2 X3.4 | length 2006.7
  Top Layer w7: X3.4@1725.73,1057.94 X3.4@1741,1042.66 ; C43.1@1744.5,1552.69 1743.31,1551.5 1743.31,1525.64 1753.77,1515.18 C39.1@1844.49,1515.18 ; X3.2@1778,1159.21 X3.2@1792.65,1144.55 ; C35.1@2103.85,1953.95 v1(2103.9,1998) ; C35.1@2106.9,1954 2106.85,1953.95 2107.35,1953.95 2112.85,1948.45 2112.85,1947.95 2126.54,1934.26 U6.63@2126.54,1850.82 ; C37.1@2113.94,1306.09 2113.94,1309.59 2126.54,1322.18 U6.18@2126.54,1398.07 ; v1(2426.77,1758.3) 2431.27,1758.3 2435.14,1754.44 2478.83,1754.44 U6.47@2480.87,1752.4 ; X1.4@2973.64,1059.94 X1.4@2988.6,1044.97 ; U4.27@3020.92,707.85 U4.27@3021,707.93 ; X1.2@3025.61,1161.51 X1.2@3040.56,1146.55 ; v1@3061.93,707.93 v1(3062,708)
  Top Layer w10: U10.3@1232.87,503.29 v1(1275.16,503.29) ; X2.2@1717.72,1618.23 1717.72,1608.38 1744.5,1581.6 C43.1@1744.5,1552.69 ; C42.1@1781.49,1834.03 1781.49,1804.45 1808.27,1777.68 X2.4@1808.27,1767.83 ; U6.12@2028.11,1555.55 v1(2071.91,1555.55) ; v1(2382.18,1433.56) 2382.31,1433.42 2382.31,1398.2 U6.31@2382.44,1398.07 ; v1(2502.7,729.27) v1@2502.87,729.1 ; U15.1@2502.87,687.8 U15.1@2503.03,687.63 ; U15.4@2579.47,687.97 U15.4@2579.64,687.8 ; v1@2579.64,646.5 v1(2579.81,646.33) ; v1(3251.34,253) U14.3@3251.34,282.09
  Top Layer w12: v1@1556.48,913.42 U7.45@1556.48,949.81 ; v1@1635.22,913.42 U7.41@1635.22,949.81 ; U7.21@1655,615.26 v1@1655,651.65 ; v1@1694.28,913.42 U7.38@1694.28,949.81 ; v1(1736.5,703.52) 1736.61,703.64 1762.88,703.64 U7.27@1772.93,713.68 ; v1@2804.3,907.59 U4.45@2804.3,943.98 ; v1@2883.13,907.68 U4.41@2883.13,944.07 ; U4.21@2902.81,609.43 2902.91,609.52 2902.91,645.91 v1(2903,646) ; v1@2942.18,907.68 U4.38@2942.18,944.07 ; U4.23@2942.28,609.52 v1@2942.28,645.91 ; U4.27@3021,707.93 v1@3061.93,707.93
  Top Layer w15: C65.1@1741,996.75 X3.4@1741,1042.66 ; X3.2@1778,1159.21 C66.1@1778,1209 ; v1@2113.94,1173 C37.1@2113.94,1306.09 ; U15.1@2502.87,687.8 v1@2502.87,729.1 ; C36.1@2577.99,1772.08 v1(2617,1772.08) ; v1@2579.64,646.5 U15.4@2579.64,687.8 ; C19.1@2701.1,1055.69 2701.1,1084.33 2713.51,1096.74 v1(2714.35,1096.74) ; v1(2805.47,1488) 2805.47,1560.47 2826.93,1581.93 LED1.2@2909.65,1581.93 ; C30.1@2988.6,992.75 X1.4@2988.6,1044.97 ; X1.2@3025.61,1161.51 C31.1@3025.61,1218
  Top Layer w20: U13.1@3214.03,433.31 v1@3214.03,469.7 ; U13.3@3288.83,433.31 v1@3288.83,469.7
  other v1: 780.41,274 1321.36,273.99 1862.3,274 2403.24,274 3155.75,308.36 780.41,319 1321.36,318.99 1862.3,319 2403.24,319 2897.75,361.14 2945.75,361.14 341.54,411.45 1521.25,464.17 1566.25,464.16 3155.75,469.7 3214.12,469.79 3288.93,469.79 1684.34,485.31 2922,497.62 1498.68,559.66 1319.5,626.49 2942.37,646 1655.09,651.74 2804.2,907.5 2883.04,907.59 2942.09,907.59 3107.01,912.24 1556.39,913.33 1635.13,913.33 1694.19,913.33 1867.72,919.05 2532.47,918.88 341.54,923.26 2968.36,992.75 1720.76,996.75 2772.5,1036.5 1431.91,1042.69 1525.32,1042.69 2869.74,1056 1621.84,1072.42 2772.5,1075.93 1525.73,1082.9 1431.91,1106.94 2113.94,1176 1798.24,1209 3045.85,1218 3360.75,1224.84 951.28,1269.34 2362.76,1280.71 2402.49,1280.7 951.28,1319.34 1209,1348 1248,1348 1209,1388 1248,1388 341.54,1435.07 884.49,1457.05 606.13,1470.9 1204.54,1535.1 1726.25,1552.69 762.01,1599.53 660.37,1605.71 700.47,1653.24 1256.64,1669.48 759.01,1682.34 721.66,1737.76 3360.75,1740.51 1216.01,1745.34 1248.01,1745.34 1434.57,1760.65 1434.57,1800.53 1216.01,1801.34 1248.01,1801.34 2951.09,1801.3 58.28,1848.42 97.28,1848.42 1926.38,1850.82 1231.83,1867.34 58.28,1888.42 97.28,1888.42 1231.83,1898.17 2951.09,1901.3 692.01,1915.68 831.51,1915.68 58.28,1928.42 97.28,1928.42 606.02,1937.24 1984.49,2144.51 1834,2197 3360.75,2252.32 759,2370 797,2370 1050,2370 1088,2370 420.94,2576.2 932.75,2576.2 1444.56,2576.2 2005.94,2576.2 2517.75,2576.2 3029.56,2576.2
I2C.SCL: R22.2 U4.25 U6.58 U7.25 | length 3284.1
  Top Layer w7: v1(1814,674.22) 1983.28,674.22 2006.06,697 2006.06,1391.76 2224.74,1610.44 v1(2224.74,1707.12) ; v1(2224.74,1787) 2224.85,1787.11 2224.85,1850.71 U6.58@2224.96,1850.82 2224.96,1896.22 2240.19,1911.45 2240.65,1911.45 2244.65,1915.45 R22.2@2244.65,1916.95
  Top Layer w12: U7.25@1773.02,674.22 v1(1814,674.22) ; U4.25@3022.26,668.48 v1(3061.93,668.48)
  Bottom Layer w7: v1(1814,674.22) 1814,469.82 1845.52,438.3 3040.29,438.3 3062,460 3062,668.41 v1(3061.93,668.48) ; v1(2224.74,1707.12) v1(2224.74,1787)
I2C.SDA: R23.2 U4.24 U6.59 U7.24 | length 3208
  Top Layer w7: v1(1843,549.98) 1998.31,549.98 2023.06,574.74 2023.06,1388.01 2250.55,1615.5 v1(2250.55,1679.56) ; v1(2195.78,1796.93) 2195.78,1799.85 2205.28,1809.35 R23.2@2205.28,1916.95
  Top Layer w12: U7.24@1713.96,615.17 1713.96,569 1732.98,549.98 v1(1843,549.98) ; v1@2961.87,573.04 U4.24@2961.87,609.43
  Bottom Layer w7: v1(1843,549.98) 1843,472.8 1858.72,457.07 2945.4,457.07 2961.68,473.36 v1(2961.68,572.85) ; v1(2195.78,1796.93) 2195.78,1688.97 2205.18,1679.56 v1(2250.55,1679.56)
IN_CK: U6.29 U15.3 | length 999.7
  Top Layer w7: U6.29@2343.07,1398.07 2343.07,1458.37 2351.06,1466.36 2384.29,1466.36 2440.23,1410.42 2440.23,785.83 2461.66,764.4 2540.34,764.4 2553.88,750.86 U15.3@2553.88,687.8
IN_CK_BUFF: U4.19 U15.5 | length 646.7
  Top Layer w12: U4.19@2863.44,609.43 v1@2863.44,645.81
  Top Layer w15: U15.5@2579.64,845.36 v1(2579.64,881.21)
  Bottom Layer w7: v1(2579.64,881.21) 2612.55,848.29 2612.55,624.45 2641,596 2848.6,596 2863.63,611.03 v1(2863.63,646)
IN_SD: U4.17 U6.36 | length 1163.8
  Top Layer w7: U6.36@2480.87,1535.86 2643.58,1535.86 2661,1518.45 v1(2661,1252)
  Top Layer w12: U4.17@2824.17,609.52 v1@2824.17,645.91
  Bottom Layer w7: v1(2661,1252) 2661,968 2824.26,804.74 v1(2824.26,646)
IN_WS: U6.62 U15.6 | length 1486.5
  Top Layer w7: v1(2112.76,1795.7) 2138.39,1795.7 2146.22,1803.53 U6.62@2146.22,1850.82 ; v1(2114,1739) 2288.9,1739 2304.49,1723.41 2304.49,1565.96 2454.23,1416.22 2454.23,791.63 2466.55,779.31 2539.83,779.31 2554.39,793.87 U15.6@2554.39,837.06
  Bottom Layer w7: v1(2112.76,1795.7) 2113.38,1795.08 2113.38,1739.62 v1(2114,1739)
IN_WS_BUFF: U4.18 U15.2 | length 510.4
  Top Layer w10: U15.2@2528.46,687.8 2528.46,555.53 2538.99,545 2834.07,545 2843.57,554.5 2843.57,572.85 ; 2843.67,572.95 U4.18@2843.67,609.33
NetC10_2: C10.2 U2.5
NetC11_2: C11.2 U1.3
NetC16_2: C16.2 R6.2 U3.7
NetC20_2: C20.2 C21.2 L2.2 U5.1
NetC22_2: C22.2 C23.2 U4.44 | length 78.2
  Top Layer w7: C22.2@2809.5,1016.25 2809.5,1012.75 2824.07,998.18 U4.44@2824.07,944.07
NetC28_1: C28.1 R7.2 | length 36.8
  Top Layer w15: C28.1@2734.79,1133.55 R7.2@2771.55,1133.55
NetC29_1: C29.1 R7.1 U4.43 | length 180.3
  Top Layer w7: C29.1@2809.5,1095.24 2835,1095.24 2843.76,1086.49 U4.43@2843.76,944.07
NetC41_2: C41.2 U6.30 | length 60.1
  Top Layer w7: C41.2@2362.76,1337.96 U6.30@2362.76,1398.07
NetC42_2: C42.2 U6.5 X2.1 | length 452.5
  Top Layer w10: C42.2@1744.49,1834.03 1744.49,1804.45 1717.72,1777.68 X2.1@1717.72,1767.83 1717.72,1709.93 1734.3,1693.34 U6.5@2028.11,1693.34
NetC43_2: C43.2 U6.6 X2.3 | length 325.1
  Top Layer w10: C43.2@1781.5,1552.69 1781.5,1581.62 1808.27,1608.38 X2.3@1808.27,1618.23 1808.27,1628.07 1853.54,1673.34 U6.6@2028.11,1673.34
NetC49_2: C49.2 C50.2 U7.44 | length 78.3
  Top Layer w7: C49.2@1562.68,1022.5 1562.68,1019 1576.17,1005.51 U7.44@1576.17,949.81
NetC63_1: C63.1 R42.2 | length 41.3
  Top Layer w15: C63.1@1484.41,1143.94 R42.2@1525.7,1143.94
NetC64_1: C64.1 R42.1 U7.43 | length 180.9
  Top Layer w7: C64.1@1562.7,1103 1586.54,1103 1595.85,1093.69 U7.43@1595.85,949.81
NetD1_2: D1.2 J1.1
NetFB1_2: FB1.2 U10.5 U10.6 | length 173.3
  Bottom Layer w7: v1(1274.68,463.92) v1(1274.68,463.92) ; v1@1447.96,463.96 v1(1448,464)
  Bottom Layer w20: v1(1274.68,463.92) v1@1447.96,463.96
NetJ2_2: J2.2 R9.2
NetJ3_2: J3.2 R10.2
NetJ4_2: J4.2 R11.1 | length 274.6
  Top Layer w7: R11.1@2165.91,1953.95 2165.91,2031.32 2243.49,2108.9 J4.2@2243.49,2196.45
NetJ5_2: J5.2 R12.2
NetJ6_2: J6.2 R13.2
NetJ7_2: J7.2 R14.1 | length 1259.8
  Top Layer w7: v1(2281.39,1549.64) v1(2281.39,1660) ; R14.1@2316.96,1300.44 R14.1@2317.48,1300.97
  Bottom Layer w7: v1(2281.39,1549.64) 2281.39,1515.52 2346.47,1450.44 2346.47,1309.71 v1(2317.48,1280.72) ; v1(2281.39,1660) 2281.39,1769.42 2298.97,1787 2586.9,1787 2609.49,1809.59 J7.2@2609.49,2196.25
NetJ8_2: J8.2 R17.2
NetJ9_2: J9.2 R18.2
NetJ11_2: J11.2 R20.2
NetJ12_2: J12.2 R21.2
NetJ13_2: J13.2 R35.2
NetJ14_2: J14.2 R36.2